# Altium PCB StylophonePCB.PcbDoc
Units mm, origin at the board's own origin, x right, y up, seen from the top; angles counter-clockwise.
Board outline 85.6 x 53.97 mm, 2 copper layers (Top Layer, Bottom Layer), stack 1.57 mm thick; 82 components, 62 nets, 235 pads, 49 vias.
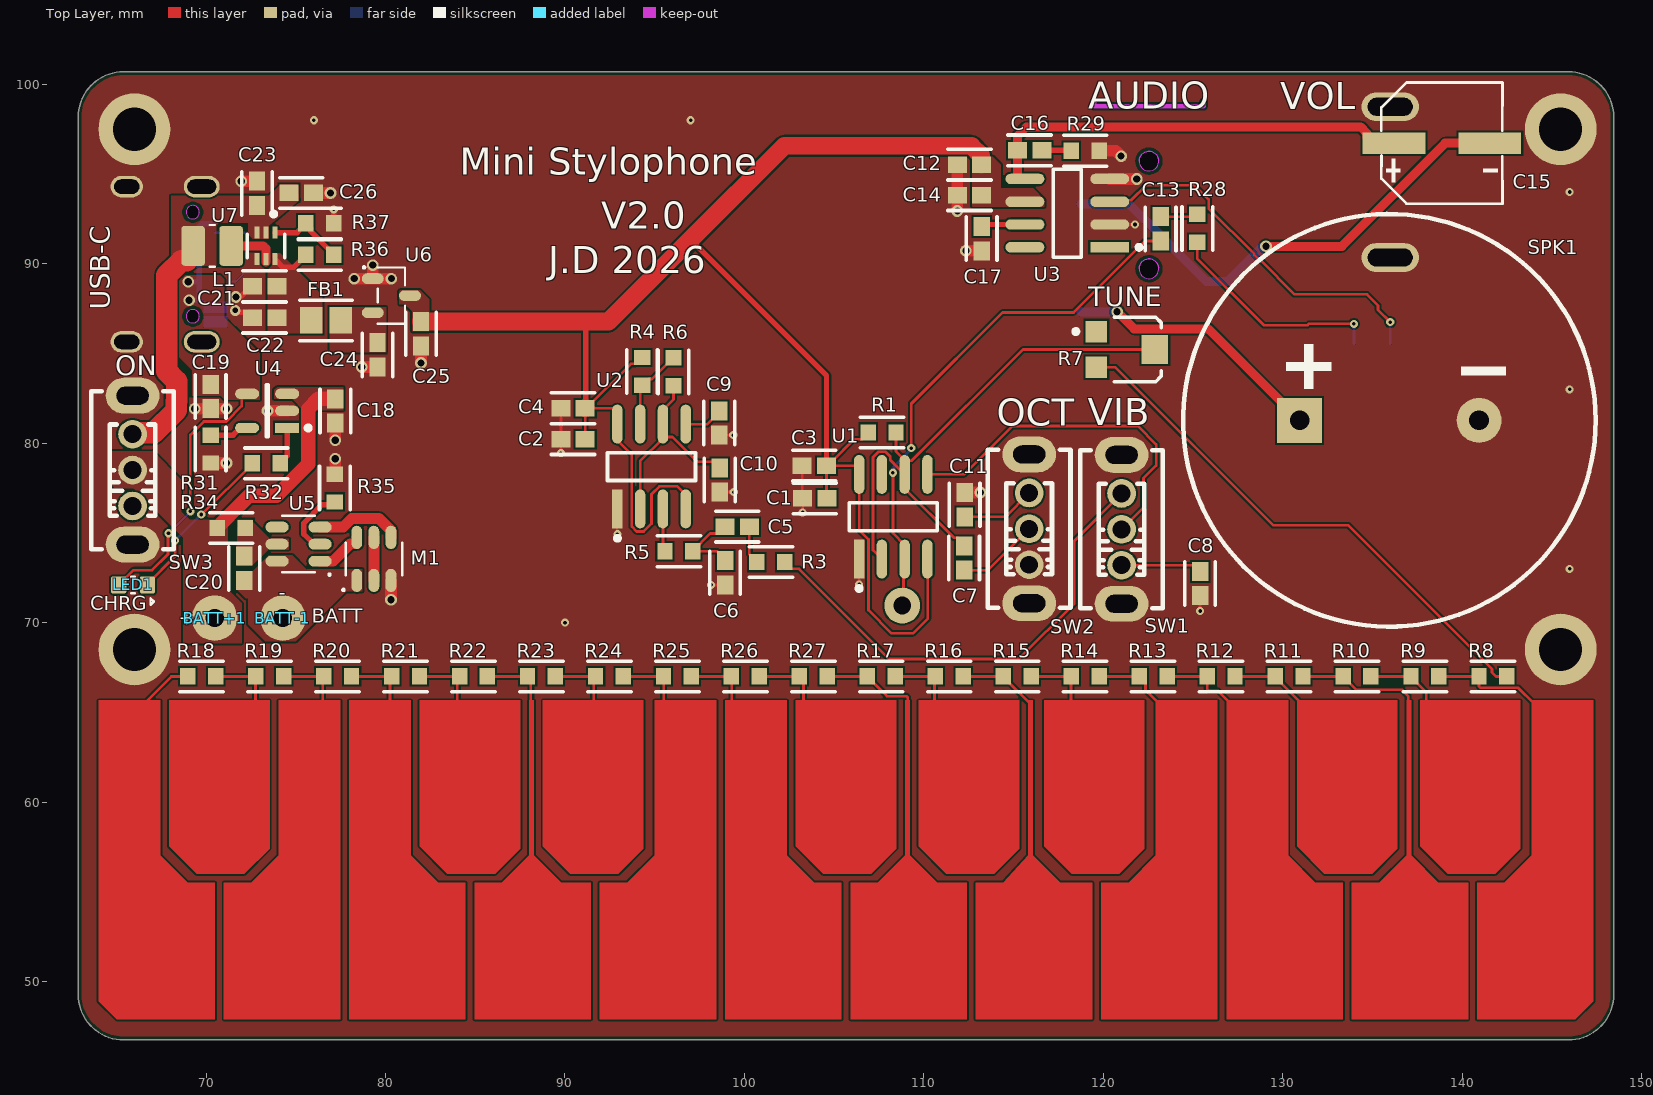
[diagram p0: Top Layer view]
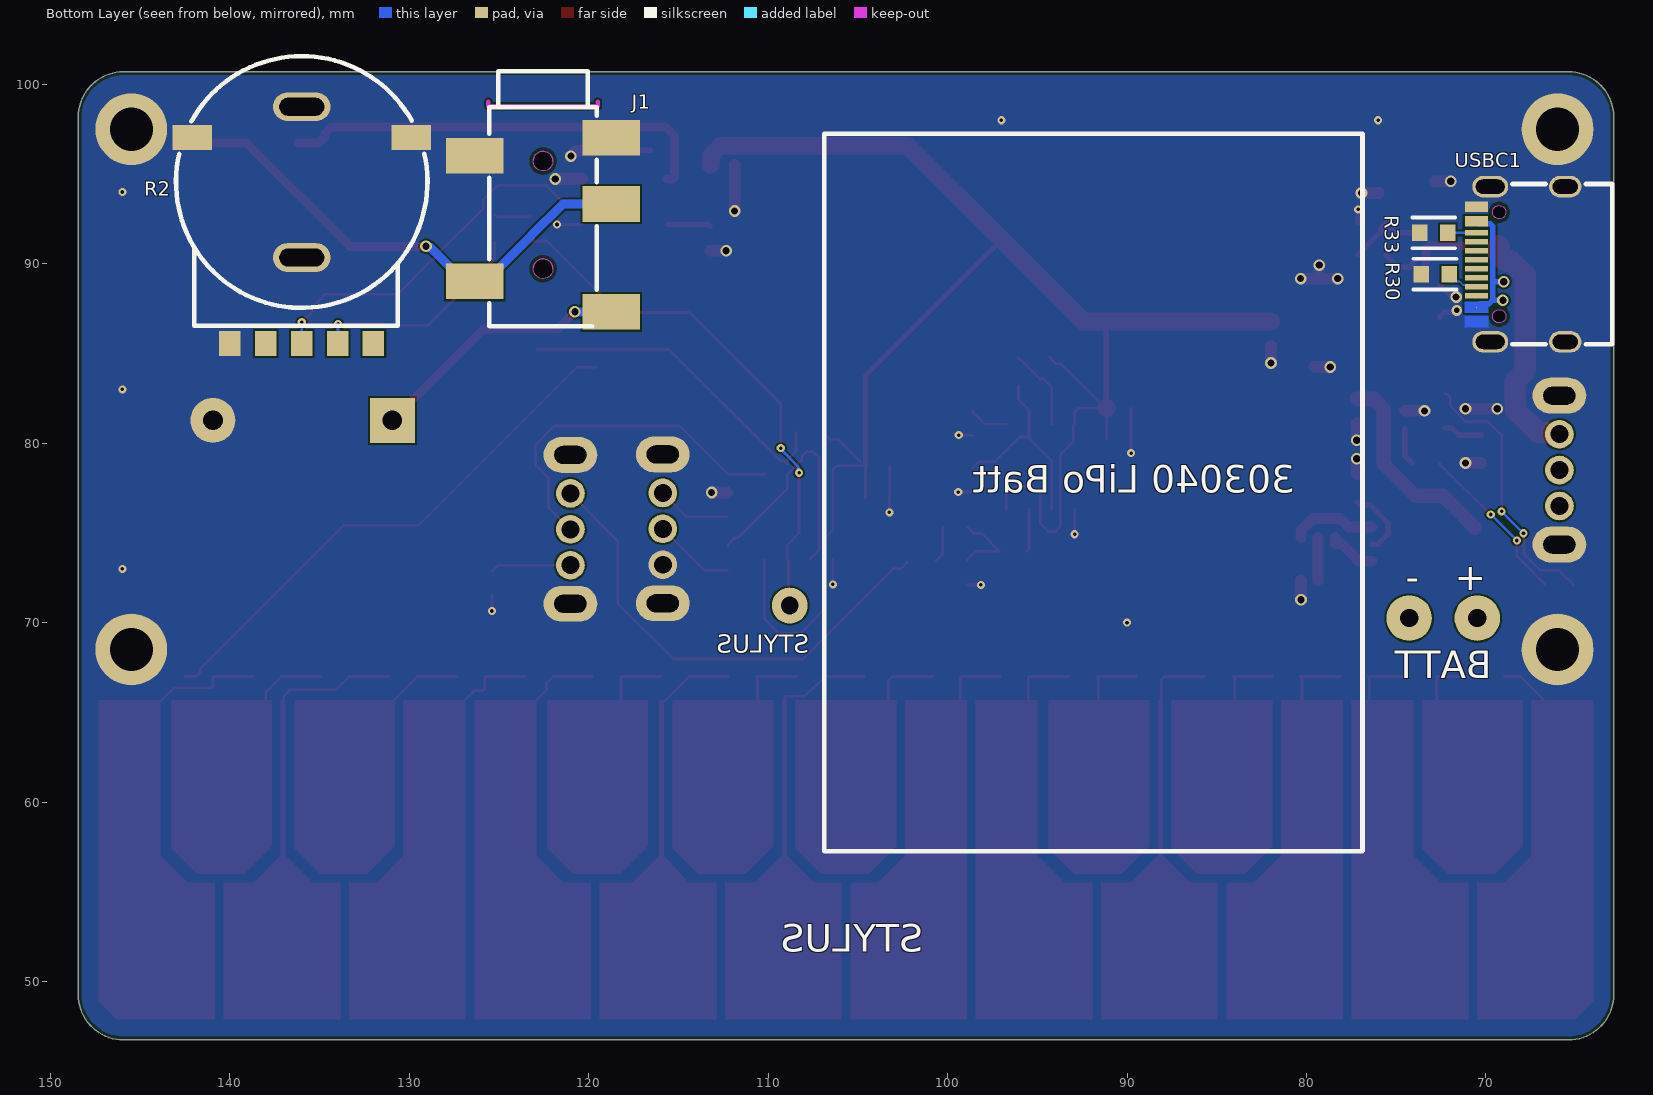
[diagram p1: Bottom Layer view, seen from below]
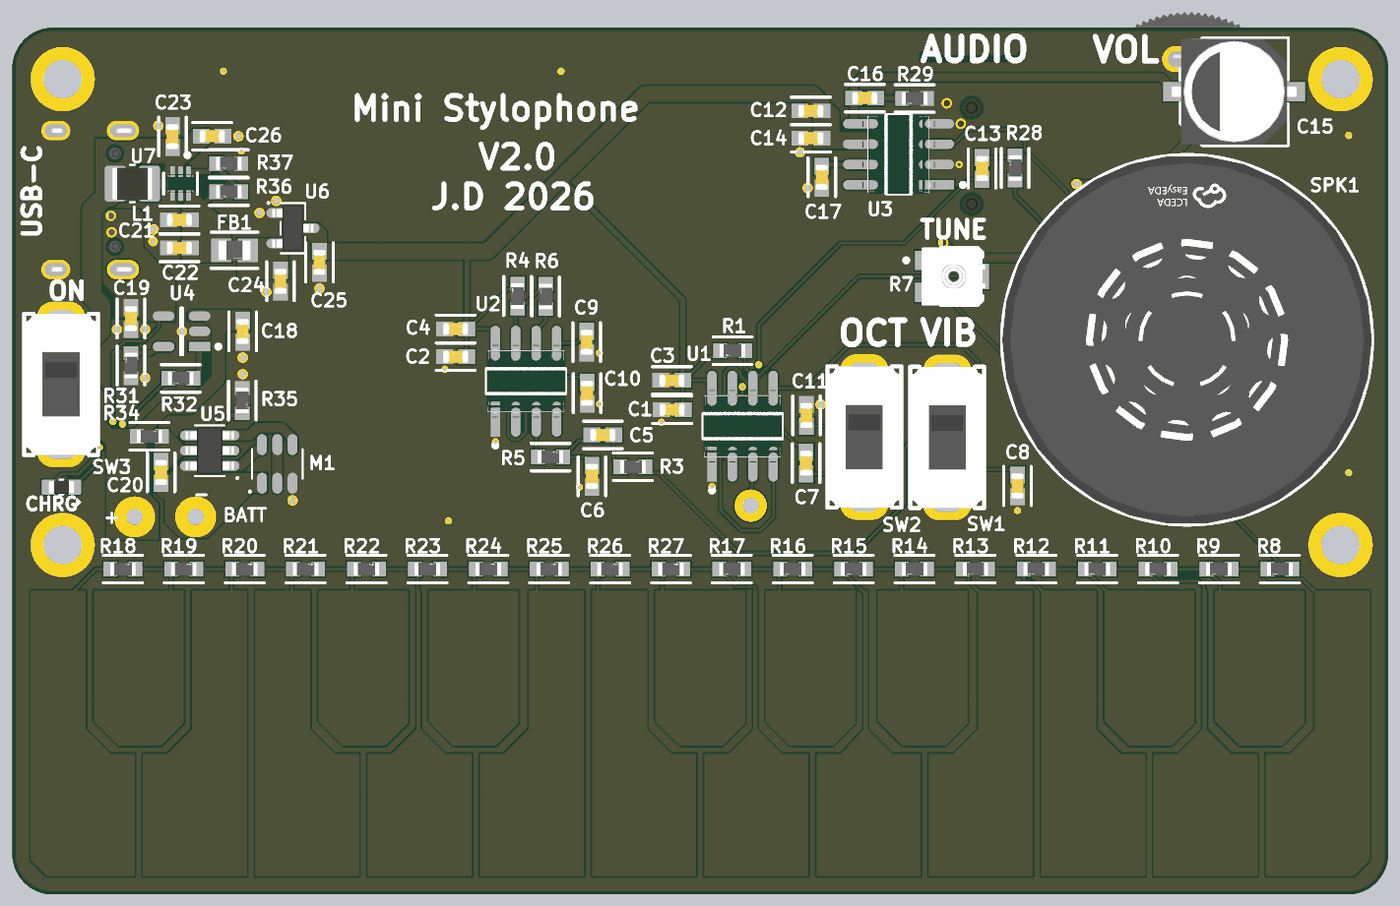
[diagram p2: 3D render of the assembled board from above, using the file's embedded part models]
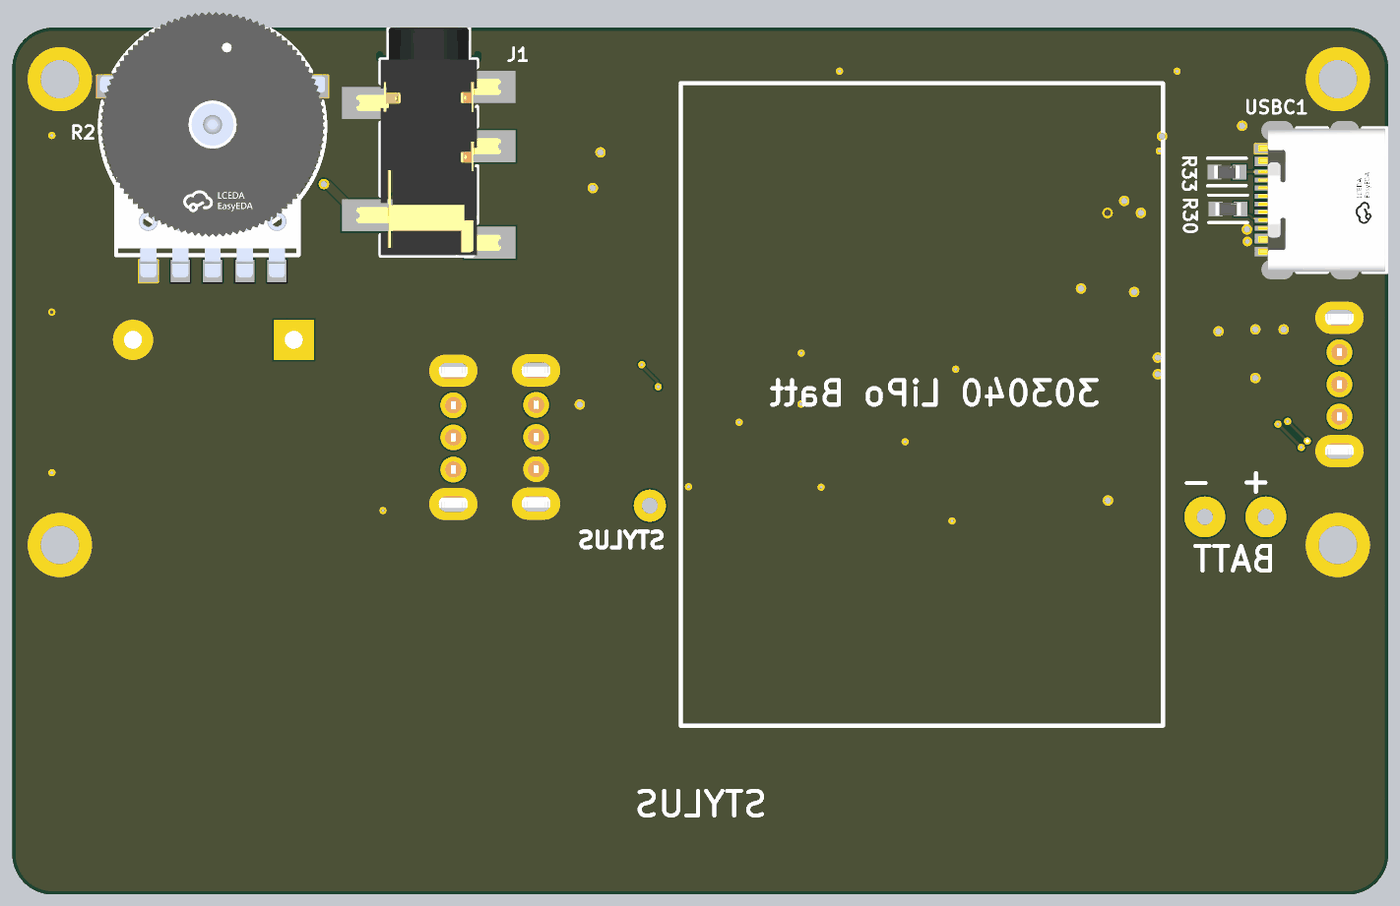
[diagram p3: 3D render of the assembled board from below, using the file's embedded part models]

## Layer stack, top to bottom
Top Solder: solder mask 0.015, Solder Resist, Dk 3.8
Top Layer: signal copper 0.035
Dielectric 1: dielectric 1.5, FR-4, Dk 4.5
Bottom Layer: signal copper 0.035
Bottom Solder: solder mask 0.015, Solder Resist, Dk 3.8

## Board outline
62.865,49.276 ccw(c65.405,49.276) 65.405,46.736 145.923,46.736 ccw(c145.923,49.276) 148.463,49.276 148.463,98.171 ccw(c145.923,98.171) 145.923,100.711 65.405,100.711 ccw(c65.405,98.171) 62.865,98.171

## Design rules (kind name [scope] priority, off if disabled: settings)
BoardOutlineClearance [All] p1: gap=0.2 ignorepadtopadclearanceinfootprint=FALSE
Clearance [All] p1: gap=0.1 ignorepadtopadclearanceinfootprint=TRUE except(0.35: Arc-THPad Track-THPad)
Clearance Clearance_1 [All] p2: gap=0.1 ignorepadtopadclearanceinfootprint=TRUE
DiffPairsRouting [All] p1: maxlimit=0.203 minlimit=0.203 mostfreqgap=0.203 toplayer_minwidth=0.24 toplayer_maxwidth=0.28 toplayer_prefwidth=0.261 bottomlayer_minwidth=0.24 bottomlayer_maxwidth=0.28 bottomlayer_prefwidth=0.261 maxuncoupledlength=3
HoleSize [All] p1: absolutevalues=TRUE maxlimit=6.3 minlimit=0.2 maxpercent=80.000 minpercent=20.000
HoleToHoleClearance [All] p1: gap=0.2 allowstackedmicrovias=TRUE
MinimumAnnularRing [Not IsVia] p1: minimumring=0.199
MinimumSolderMaskSliver MinimumSolderMaskSliver_Footprint [InAnyComponent vs InAnyComponent] p1: minsoldermaskwidth=0.09
MinimumSolderMaskSliver [All] p2: minsoldermaskwidth=0.1
PolygonConnect [All] p1: connectstyle=Direct reliefconductorwidth=0.5 reliefentries=4 polygonreliefangle="90 Angle" conductorbypadedge=TRUE mindistance=0.381 enablemindistance=FALSE airgapwidth=0.254
RoutingVias [All] p1: holewidth=0.2 width=0.45 viastyle="Through Hole" minholewidth=0.2 minwidth=0.45 maxholewidth=0.4 maxwidth=0.65
SilkToSilkClearance [All] p1: silktosilkclearance=0.15
SilkToSolderMaskClearance [IsPad] p1: minsilkscreentomaskgap=0.15 clearancetoexposedcopper=TRUE
SolderMaskExpansion [All] p1: expansion=0 istentingtop=FALSE
SupplyNets "Schematic Supply Nets_6" [InNet('5V_USB')] p1: voltage=0.000
SupplyNets "Schematic Supply Nets_5" [InNet('5V')] p2: voltage=0.000
SupplyNets "Schematic Supply Nets_4" [InNet('BATT+')] p3: voltage=0.000
SupplyNets "Schematic Supply Nets_3" [InNet('+3V3')] p4: voltage=0.000
SupplyNets "Schematic Supply Nets_2" [InNet('+1V1')] p5: voltage=0.000
SupplyNets "Schematic Supply Nets_1" [InNet('+5V')] p6: voltage=0.000
SupplyNets "Schematic Supply Nets" [InNet('GND')] p7: voltage=0.000
Width [All] p1: maxlimit=3 minlimit=0.1 preferedwidth=0.15 minimp=50.000000 maximp=50.000000 favimp=50.000000
24 further rules are at their usual default settings.

## Classes and differential pairs
component class ToneGenerator: C1 C2 C3 C4 C5 C6 C7 C8 C9 C10 C11 R1 R3 R4 R5 R6 R7 R8 R9 R10 R11 R12 R13 R14 R15 R16 R17 R18 R19 R20 R21 R22 R23 R24 R25 R26 R27 SW1 SW2 U1 U2
component class Power: BATT+1 BATT-1 C18 C19 C20 C21 C22 C23 C24 C25 C26 FB1 L1 LED1 M1 R30 R31 R32 R33 R34 R35 R36 R37 SW3 U4 U5 U6 U7 USBC1
component class Amplifier: C12 C13 C14 C15 C16 C17 J1 R2 R28 R29 SPK1 U3

## Components (designator, comment, footprint, x,y, rotation, side; value= is the part's Value field where it differs from the comment)
BATT+1 "THT 100mil pad" "THT 100mil pad-Footprint-1"#1 70.475,70.2 r90 top
BATT-1 "THT 100mil pad" "THT 100mil pad-Footprint-1"#2 74.275,70.25 r90 top
C1 "Cap 22uF 0603" FP-CC0603-DA-IPC_B 104.6,76.925 r180 top value=22uF
C2 "Cap 22uF 0603" FP-CC0603-DA-IPC_B 91.129,80.225 r180 top value=22uF
C3 "Cap 100nF 0603" FP-CC0603-DA-IPC_B 104.575,78.75 r180 top value=100nF
C4 "Cap 100nF 0603" FP-CC0603-DA-IPC_B 91.129,81.95 r180 top value=100nF
C5 "Cap 10uF 0603" FP-CC0603-DA-IPC_B 98.925,75.35 r0 top value=10uF
C6 "Cap 1uF 0603" FP-CC0603-DA-IPC_B 98.925,72.1 r90 top value=1uF
C7 "Cap 100nF 0603" FP-CC0603-DA-IPC_B 112.25,74.275 r270 top value=100nF
C8 "Cap 10nF 0603" FP-CC0603-DA-IPC_B 125.4,71.5 r90 top value=10nF
C9 "Cap 10nF 0603" FP-CC0603-DA-IPC_B 98.6,80.45 r90 top value=10nF
C10 "Cap 10uF 0603" FP-CC0603-DA-IPC_B 98.625,77.275 r90 top value=10uF
C11 "Cap 100nF 0603" FP-CC0603-DA-IPC_B 112.275,75.896 r90 top value=100nF
C12 "Cap 22uF 0603" FP-CC0603-DA-IPC_B 113.225,95.525 r180 top value=22uF
C13 "Cap 1uF 0603" FP-CC0603-DA-IPC_B 123.2,91.271 r90 top value=1uF
C14 "Cap 100nF 0603" FP-CC0603-DA-IPC_B 113.225,93.825 r180 top value=100nF
C15 "VT1C221M0607" VT1C221M0607-Footprint-1 134.46,93.349 r0 top value=220uF
C16 "Cap 100nF 0603" FP-CC0603-DA-IPC_B 115.225,96.325 r0 top value=100nF
C17 "Cap 10uF 0603" FP-CC0603-DA-IPC_B 113.225,90.725 r90 top value=10uF
C18 "Cap 4.7uF 0603" FP-CC0603-DA-IPC_B 77.2,81.121 r90 top value=4.7uF
C19 "Cap 4.7uF 0603" FP-CC0603-DA-IPC_B 70.25,81.921 r90 top value=4.7uF
C20 "Cap 100nF 0603" FP-CC0603-DA-IPC_B 72.125,72.346 r90 top value=100nF
C21 "Cap 22uF 0603" FP-CC0603-DA-IPC_B 72.585,88.75 r0 top value=22uF
C22 "Cap 22uF 0603" FP-CC0603-DA-IPC_B 72.585,87 r0 top value=22uF
C23 "Cap 10uF 0603" FP-CC0603-DA-IPC_B 72.835,94.604 r270 top value=10uF
C24 "Cap 1uF 0603" FP-CC0603-DA-IPC_B 79.55,84.246 r90 top value=1uF
C25 "Cap 1uF 0603" FP-CC0603-DA-IPC_B 81.975,85.425 r90 top value=1uF
C26 "Cap 100nF 0603" FP-CC0603-DA-IPC_B 75.979,93.95 r180 top value=100nF
FB1 "BLM21AG601SN1D" FP-BLM21-0_2-t0_85-e0_5-IPC_B 76.685,86.85 r0 top
J1 "PJ-327A 5JJ" "PJ-327A 5JJ-Footprint-1" 122.55,92.176 r180 bottom
L1 "FWP252012P-1R0ML" INDC2520X120N 70.335,91 r0 top
LED1 "XL-1608SURC-06" DIOC1608X60N 65.925,72.1 r180 top
M1 "FS8205A" SOT95P280X125-6N 79.35,73.55 r90 top
R1 "Res 1M 0603" FP-RC0603-0_55-IPC_B 107.675,80.6 r180 top value=1M
R2 "RK10J12R0A0B" RK10J12R0A0B-Footprint-1 136,92.152 r180 bottom
R3 "Res 47k 0603" FP-RC0603-0_55-IPC_B 101.475,73.375 r0 top value=47k
R4 "Res 1k 0603" FP-RC0603-0_55-IPC_B 94.3,84 r90 top value=1k
R5 "Res 100k 0603" FP-RC0603-0_55-IPC_B 96.35,73.975 r0 top value=100k
R6 "Res 10k 0603" FP-RC0603-0_55-IPC_B 96.05,83.975 r90 top value=10k
R7 "TC33X-2-103E" BOUR-TC33X-2_V 121.425,85.225 r0 top value=10k
R8 "Res 5k1 0603" FP-RC0603-0_55-IPC_B 141.723,67 r180 top value=5.9k
R9 "Res 620R 0603" FP-RC0603-0_55-IPC_B 137.935,67 r180 top value=649
R10 "Res 680R 0603" FP-RC0603-0_55-IPC_B 134.147,67 r180 top value=698
R11 "Res 750R 0603" FP-RC0603-0_55-IPC_B 130.359,67 r180 top value=715
R12 "Res 750R 0603" FP-RC0603-0_55-IPC_B 126.571,67 r180 top value=787
R13 "Res 820R 0603" FP-RC0603-0_55-IPC_B 122.783,67 r180 top value=806
R14 "Res 910R 0603" FP-RC0603-0_55-IPC_B 118.995,67 r180 top value=887
R15 "Res 910R 0603" FP-RC0603-0_55-IPC_B 115.207,67 r180 top value=909
R16 "Res 1k 0603" FP-RC0603-0_55-IPC_B 111.419,67 r180 top value=976
R17 "Res 1k 0603" FP-RC0603-0_55-IPC_B 107.631,67 r180 top value=1.02k
R18 "Res 1k8 0603" FP-RC0603-0_55-IPC_B 69.75,67 r0 top value=1.82k
R19 "Res 1k8 0603" FP-RC0603-0_55-IPC_B 73.538,67 r0 top value=1.74k
R20 "Res 1k6 0603" FP-RC0603-0_55-IPC_B 77.326,67 r0 top value=1.65k
R21 "Res 1k5 0603" FP-RC0603-0_55-IPC_B 81.114,67 r0 top value=1.54k
R22 "Res 1k5 0603" FP-RC0603-0_55-IPC_B 84.902,67 r0 top value=1.47k
R23 "Res 1k3 0603" FP-RC0603-0_55-IPC_B 88.69,67 r0 top value=1.37k
R24 "Res 1k3 0603" FP-RC0603-0_55-IPC_B 92.478,67 r0 top value=1.3k
R25 "Res 1k3 0603" FP-RC0603-0_55-IPC_B 96.266,67 r0 top value=1.21k
R26 "Res 1k1 0603" FP-RC0603-0_55-IPC_B 100.055,67 r0 top value=1.18k
R27 "Res 1k1 0603" FP-RC0603-0_55-IPC_B 103.843,67 r0 top value=1.1k
R28 "Res 180k 0603" FP-RC0603-0_55-IPC_B 125.25,91.975 r90 top value=180k
R29 "Res 10R 0603" FP-RC0603-0_55-IPC_B 119,96.3 r180 top value=10
R30 "Res 5k1 0603" FP-RC0603-0_55-IPC_B 72.825,89.425 r180 bottom value=5.1k
R31 "Res 3k 0603" FP-RC0603-0_55-IPC_B 70.25,79.675 r90 top value=3k
R32 "Res 470 0603" FP-RC0603-0_55-IPC_B 73.35,78.875 r180 top value=470
R33 "Res 5k1 0603" FP-RC0603-0_55-IPC_B 72.9,91.725 r180 bottom value=5.1k
R34 "Res 100R 0603" FP-RC0603-0_55-IPC_B 71.4,75.275 r0 top value=100R
R35 "Res 1k 0603" FP-RC0603-0_55-IPC_B 77.175,77.5 r270 top value=1k
R36 "Res 820k 0603" FP-RC0603-0_55-IPC_B 76.335,90.5 r180 top value=820k
R37 "Res 100k 0603" FP-RC0603-0_55-IPC_B 76.335,92.25 r180 top value=100k
SPK1 "GSPK2307P-8R1W" GSPK2307P-8R1W-Footprint-1 124.39,69.588 r0 top
SW1 "SS12D07VG4 087" "SS12D07VG4 087-Footprint-1" 121.025,75.199 r90 top
SW2 "SS12D07VG4 087" "SS12D07VG4 087-Footprint-1" 115.875,75.225 r90 top
SW3 "SS12D07VG4 087" "SS12D07VG4 087-Footprint-1" 65.9,78.5 r90 top
U1 "LMC555" FP-D0008A-IPC_B 108.3,75.9 r90 top
U2 "LMC555" FP-D0008A-IPC_B 94.825,78.7 r90 top
U3 "LM386MX-1/NOPB" FP-D0008A-IPC_B 118,92.825 r180 top
U4 "MCP73831T-2ACI/OT" FP-C04-091-OT-IPC_B 73.4,81.8 r180 top
U5 "DW01A" SOT95P280X120-6N 75.15,74.375 r180 top
U6 "XC6206P502MR-MS" SOT95P240X115-3N 80.325,88.225 r0 top
U7 "TPS61023DRLR" FP-DRL0006A-MFG 73.335,91 r270 top
USBC1 "TYPE-C-31-M-12" TYPE-C-31-M-12-Footprint-1 69.755,94.3 r90 bottom

## Footprints (in the part's own frame and the unit in brackets; to place one, negate y for a bottom-side part, rotate by r counter-clockwise, add the part's x,y. Pads: shape width x height; smd on the part's side, far side on the other; paste and mask are expansions set on the pad)
BOUR-TC33X-2_V [mm] "SMD, 3-Leads, Body 3.8x3.6mm"
  rect 1.2x1.2 smd: 1(-1.8,1) 3(-1.8,-1)
  rect 1.5x1.6 smd: 2(1.45,0)
  silkscreen extent -3.07,-1.8 1.8,1.8, body extent -2,-1.8 1.96,1.8, height 1.15
DIOC1608X60N [mm] "Chip Diode, 2-Leads, Body 1.60x0.80mm, IPC Medium Density"
  rrect25% 0.85x0.95 smd: 1(-0.8,0) 2(0.8,0)
  silkscreen extent -1.16,-0.46 0.11,1.12, body extent -0.8,-0.4 0.8,0.4, height 0.6
FP-BLM21-0_2-t0_85-e0_5-IPC_B [mm]
  rect 1.255x1.456 smd paste+0 mask+0: 1(-0.826,0) 2(0.826,0)
  silkscreen extent -1.45,-1.13 1.45,1.13, body extent -1.7,-0.98 1.7,0.98, height 0.25
FP-C04-091-OT-IPC_B [mm]
  rect 1.338x0.578 smd paste+0 mask+0: 1(-1.116,0.95)
  rrect100% 1.338x0.578 smd paste+0 mask+0: 2(-1.116,0) 3(-1.116,-0.95) 4(1.116,-0.95) 5(1.116,0.95)
  silkscreen extent -2.41,-1.45 0.05,1.45
FP-CC0603-DA-IPC_B [mm]
  rect 1.058x0.912 smd paste+0 mask+0: 1(0,0) 2(1.354,0)
  silkscreen extent -0.53,-0.86 1.88,0.86, body extent -0.78,-0.71 2.13,0.71, height 0.25
FP-D0008A-IPC_B [mm]
  rect 2.169x0.582 smd paste+0 mask+0: 1(-2.364,1.905)
  rrect100% 2.169x0.582 smd paste+0 mask+0: 2(-2.364,0.635) 3(-2.364,-0.635) 4(-2.364,-1.905) 5(2.364,-1.905) 6(2.364,-0.635) 7(2.364,0.635) 8(2.364,1.905)
  silkscreen extent -4.12,-2.45 0.78,2.45, body extent -3.7,-2.7 3.7,2.7, height 0.25
FP-DRL0006A-MFG [mm]
  rrect33% 0.67x0.3 smd paste+0 mask+0: 1(-0.74,0.5) 2(-0.74,0) 3(-0.74,-0.5) 4(0.74,-0.5) 5(0.74,0) 6(0.74,0.5)
  silkscreen extent -1.9,-1.05 0.65,1.05, body extent -1.17,-1.1 1.17,1.1, height 0.25
FP-RC0603-0_55-IPC_B [mm]
  rect 0.859x0.912 smd paste+0 mask+0: 1(-0.777,0) 2(0.777,0)
  silkscreen extent -1.21,-0.86 1.21,0.86, body extent -1.46,-0.71 1.46,0.71, height 0.25
GSPK2307P-8R1W-Footprint-1 [mm]
  rect 2.5x2.5 hole 1.1: +(6.56,11.687)
  round 2.5 hole 1.1: -(16.56,11.687)
  silkscreen extent 0.06,0.19 23.06,23.19, body extent 0.06,0.18 23.06,23.18, height 8.01
INDC2520X120N [mm] "Chip Inductor, 2-Leads, Body 2.50x2.00mm, IPC Medium Density"
  rrect25% 1.3x2.22 smd: 1(-1.06,0) 2(1.06,0)
  silkscreen extent -0.15,-1.16 0.15,1.16, body extent -1.25,-1 1.25,1, height 1.2
"PJ-327A 5JJ-Footprint-1" [mil]
  rect 126x78.7 smd: 1(149.6,190.95) 2(-149.6,151.55) 3(149.6,45.25) 4(-149.6,-124.05) 5(149.6,-190.95)
  Keep-Out Layer board cut-out: 21.6,-96.45 21.3,-100.55 20.1,-104.55 18.2,-108.15 15.7,-111.45 12.6,-114.15 9,-116.15 5.1,-117.55 1,-118.15 -3.1,-117.95 -7.1,-116.95 -10.8,-115.25 -14.2,-112.85 -17,-109.85 -19.3,-106.45 -20.8,-102.55 -21.6,-98.55 -21.6,-94.45 -20.8,-90.35 -19.3,-86.55 -17,-83.15 -14.2,-80.15 -10.8,-77.75 -7.1,-76.05 -3.1,-75.05 1,-74.85 5.1,-75.45 9,-76.75 12.6,-78.85 15.7,-81.55 18.2,-84.75 20.1,-88.45 21.3,-92.35 21.6,-96.45
  Keep-Out Layer board cut-out: 21.6,139.75 21.3,135.65 20.1,131.65 18.2,128.05 15.7,124.75 12.6,122.05 9,120.05 5.1,118.65 1,118.15 -3.1,118.25 -7.1,119.25 -10.8,120.95 -14.2,123.35 -17,126.35 -19.3,129.85 -20.8,133.65 -21.6,137.65 -21.6,141.75 -20.8,145.85 -19.3,149.65 -17,153.15 -14.2,156.05 -10.8,158.45 -7.1,160.15 -3.1,161.15 1,161.35 5.1,160.75 9,159.45 12.6,157.35 15.7,154.65 18.2,151.45 20.1,147.75 21.3,143.85 21.6,139.75
  Keep-Out Layer region: 21.6,-96.45 21.3,-100.55 20.1,-104.55 18.2,-108.15 15.7,-111.45 12.6,-114.15 9,-116.15 5.1,-117.55 1,-118.15 -3.1,-117.95 -7.1,-116.95 -10.8,-115.25 -14.2,-112.85 -17,-109.85 -19.3,-106.45 -20.8,-102.55 -21.6,-98.55 -21.6,-94.45 -20.8,-90.35 -19.3,-86.55 -17,-83.15 -14.2,-80.15 -10.8,-77.75 -7.1,-76.05 -3.1,-75.05 1,-74.85 5.1,-75.45 9,-76.75 12.6,-78.85 15.7,-81.55 18.2,-84.75 20.1,-88.45 21.3,-92.35 21.6,-96.45
  Keep-Out Layer region: 21.6,-96.45 21.3,-100.55 20.1,-104.55 18.2,-108.15 15.7,-111.45 12.6,-114.15 9,-116.15 5.1,-117.55 1,-118.15 -3.1,-117.95 -7.1,-116.95 -10.8,-115.25 -14.2,-112.85 -17,-109.85 -19.3,-106.45 -20.8,-102.55 -21.6,-98.55 -21.6,-94.45 -20.8,-90.35 -19.3,-86.55 -17,-83.15 -14.2,-80.15 -10.8,-77.75 -7.1,-76.05 -3.1,-75.05 1,-74.85 5.1,-75.45 9,-76.75 12.6,-78.85 15.7,-81.55 18.2,-84.75 20.1,-88.45 21.3,-92.35 21.6,-96.45
  Keep-Out Layer region: 21.6,139.75 21.3,135.65 20.1,131.65 18.2,128.05 15.7,124.75 12.6,122.05 9,120.05 5.1,118.65 1,118.15 -3.1,118.25 -7.1,119.25 -10.8,120.95 -14.2,123.35 -17,126.35 -19.3,129.85 -20.8,133.65 -21.6,137.65 -21.6,141.75 -20.8,145.85 -19.3,149.65 -17,153.15 -14.2,156.05 -10.8,158.45 -7.1,160.15 -3.1,161.15 1,161.35 5.1,160.75 9,159.45 12.6,157.35 15.7,154.65 18.2,151.45 20.1,147.75 21.3,143.85 21.6,139.75
  Keep-Out Layer region: 21.6,139.75 21.3,135.65 20.1,131.65 18.2,128.05 15.7,124.75 12.6,122.05 9,120.05 5.1,118.65 1,118.15 -3.1,118.25 -7.1,119.25 -10.8,120.95 -14.2,123.35 -17,126.35 -19.3,129.85 -20.8,133.65 -21.6,137.65 -21.6,141.75 -20.8,145.85 -19.3,149.65 -17,153.15 -14.2,156.05 -10.8,158.45 -7.1,160.15 -3.1,161.15 1,161.35 5.1,160.75 9,159.45 12.6,157.35 15.7,154.65 18.2,151.45 20.1,147.75 21.3,143.85 21.6,139.75
  Keep-Out Layer lines w0.1: 21.6,-96.45 21.3,-92.35 20.1,-88.45 18.2,-84.75 15.7,-81.55 12.6,-78.85 9,-76.75 5.1,-75.45 1,-74.85 -3.1,-75.05 -7.1,-76.05 -10.8,-77.75 -14.2,-80.15 -17,-83.15 -19.3,-86.55 -20.8,-90.35 -21.6,-94.45 -21.6,-98.55 -20.8,-102.55 -19.3,-106.45 -17,-109.85 -14.2,-112.85 -10.8,-115.25 -7.1,-116.95 -3.1,-117.95 1,-118.15 5.1,-117.55 9,-116.15 12.6,-114.15 15.7,-111.45 18.2,-108.15 20.1,-104.55 21.3,-100.55 21.6,-96.45 ; 21.6,139.75 21.3,143.85 20.1,147.75 18.2,151.45 15.7,154.65 12.6,157.35 9,159.45 5.1,160.75 1,161.35 -3.1,161.15 -7.1,160.15 -10.8,158.45 -14.2,156.05 -17,153.15 -19.3,149.65 -20.8,145.85 -21.6,141.75 -21.6,137.65 -20.8,133.65 -19.3,129.85 -17,126.35 -14.2,123.35 -10.8,120.95 -7.1,119.25 -3.1,118.25 1,118.15 5.1,118.65 9,120.05 12.6,122.05 15.7,124.75 18.2,128.05 20.1,131.65 21.3,135.65 21.6,139.75
  Keep-Out Layer lines w10: 120,269.95 120,259.95 -120,259.95 -120,269.95
  silkscreen extent -118,-222 118,337, body extent -177,-222 177,337, height 187
RK10J12R0A0B-Footprint-1 [mil]
  rect 47.2x55.1 smd paste-3937 mask+2: 1(-157.45,-259.85) 2(-78.75,-259.85) 3(157.45,-259.85) 4(0.05,-259.85) 5(78.75,-259.85)
  rect 86.6x55.1 smd paste-3937 mask+2: 6(-240.15,192.85) 6(240.15,192.85)
  oval 126x63 hole 39.4 slot 98.4 at 0 deg: 7(0.05,-70.95) 7(0.05,259.85)
  silkscreen extent -276,-221 276,371, body extent -276,-275 276,375, height 98
SOT95P240X115-3N [mm] "SOT23, 3-Leads, Body 2.90x2.40mm, Pitch 0.95mm, IPC Medium Density"
  oval 1.225x0.6 smd: 1(-1.038,0.95) 2(-1.038,-0.95) 3(1.037,0)
  silkscreen extent -1.59,-1.56 0.76,1.64, body extent -1.28,-1.45 1.28,1.45, height 1.15
SOT95P280X120-6N [mm] "SOT23, 6-Leads, Body 2.91x2.80mm, Pitch 0.95mm, IPC Medium Density"
  oval 1.3x0.6 smd: 1(-1.2,0.95) 2(-1.2,0) 3(-1.2,-0.95) 4(1.2,-0.95) 5(1.2,0) 6(1.2,0.95)
  silkscreen extent -1.79,-1.57 0.91,1.76, body extent -1.5,-1.46 1.5,1.46, height 1.2
SOT95P280X125-6N [mm] "SOT23, 6-Leads, Body 2.92x2.80mm, Pitch 0.95mm, IPC Medium Density"
  oval 1.3x0.6 smd: 1(-1.2,0.95) 2(-1.2,0) 3(-1.2,-0.95) 4(1.2,-0.95) 5(1.2,0) 6(1.2,0.95)
  silkscreen extent -1.79,-1.57 0.91,1.76, body extent -0.8,-1.46 0.8,1.46, height 1.25
"SS12D07VG4 087-Footprint-1" [mil]
  round 63 hole 39.4: 1(-78.75,0) 2(0.05,0) 3(78.75,0)
  oval 78.7x118.1 hole 39.4 slot 70.9 at 90 deg: 4(163.35,0) 5(-163.35,0)
  silkscreen extent -173,-91 173,91, body extent -173,-91 173,91, height 343
"THT 100mil pad-Footprint-1"#1 [mm]
  round 2.54 hole 1.016: 1(0.05,0)
"THT 100mil pad-Footprint-1"#2 [mm]
  round 2.54 hole 1.016: 1(0,0)
TYPE-C-31-M-12-Footprint-1 [mm]
  oval 1.2x2 hole 0.8 slot 1.6 at 90 deg: 1(0,0) 4(-8.65,0)
  oval 1.2x1.8 hole 0.8 slot 1.4 at 90 deg copper offset 0,0: 2(0,-4.18) 3(-8.65,-4.18)
  round 0.025 smd paste-100 mask+0.051: A1B12(-7.525,0.768) A4B9(-6.731,0.762)
  rect 0.3x1.3 smd paste-100 mask+0.051: A5(-5.575,0.768) A6(-4.575,0.768) A7(-4.075,0.768) A8(-3.075,0.768) B5(-2.575,0.768) B6(-3.575,0.768) B7(-5.075,0.768) B8(-6.075,0.768)
  rect 0.6x1.3 smd paste-100 mask+0.051: B1A12(-1.125,0.768) B4A9(-1.925,0.768)
  Keep-Out Layer board cut-out: -1.05,-0.5 -1.087,-0.663 -1.191,-0.793 -1.342,-0.866 -1.508,-0.866 -1.659,-0.793 -1.763,-0.663 -1.8,-0.5 -1.8,-0.5 -1.763,-0.337 -1.659,-0.207 -1.508,-0.134 -1.342,-0.134 -1.191,-0.207 -1.087,-0.337 -1.05,-0.5
  Keep-Out Layer board cut-out: -6.85,-0.5 -6.887,-0.663 -6.991,-0.793 -7.141,-0.866 -7.308,-0.866 -7.459,-0.793 -7.563,-0.663 -7.6,-0.5 -7.6,-0.5 -7.563,-0.337 -7.459,-0.207 -7.308,-0.134 -7.141,-0.134 -6.991,-0.207 -6.887,-0.337 -6.85,-0.5
  Keep-Out Layer circle w0.025: c-1.425,-0.5 r0.375
  Keep-Out Layer circle w0.025: c-7.225,-0.5 r0.375
  Keep-Out Layer region: -1.05,-0.5 -1.087,-0.663 -1.191,-0.793 -1.342,-0.866 -1.508,-0.866 -1.659,-0.793 -1.763,-0.663 -1.8,-0.5 -1.8,-0.5 -1.763,-0.337 -1.659,-0.207 -1.508,-0.134 -1.342,-0.134 -1.191,-0.207 -1.087,-0.337 -1.05,-0.5
  Keep-Out Layer region: -6.85,-0.5 -6.887,-0.663 -6.991,-0.793 -7.141,-0.866 -7.308,-0.866 -7.459,-0.793 -7.563,-0.663 -7.6,-0.5 -7.6,-0.5 -7.563,-0.337 -7.459,-0.207 -7.308,-0.134 -7.141,-0.134 -6.991,-0.207 -6.887,-0.337 -6.85,-0.5
  silkscreen extent -8.79,-6.8 0.15,-1.22, body extent -8.79,-6.7 0.15,1.2, height 3.25
VT1C221M0607-Footprint-1 [mm]
  rect 3.5x1.2 smd: +(1.75,3.376) -(7.09,3.376)
  silkscreen extent 1.04,0 7.8,6.75, body extent 0.52,0.08 8.32,6.68, height 7.7

## Part data
BATT+1 BATT-1: library part CMP-00020-1, "40mil hole, 100mil pad THT", Hole Diameter=40mil, Pad Diameter=100mil
C1 C2 C12 C21 C22: library part CMP-001-00003-1, "22uF 6.3V 20% X5R 0603 SMD Capacitor", Case/Package=0603, Temperature Coefficient=X5R, Tolerance=20%, Voltage Rating=6.3V, Mounting Technology=SMT
C3 C4 C7 C11 C14 C16 C20 C26: library part CMP-00006-5, "100nF 50V 10% X7R 0603 SMD Capacitor Decoupling", Case/Package=0603, Temperature Coefficient=X7R, Tolerance=10%, Voltage Rating=50V, Mounting Technology=SMT
C5 C10 C17 C23: library part CMP-001-00002-1, "10uF 6.3V 10% X5R 0603 SMD Capacitor", Case/Package=0603, Temperature Coefficient=X5R, Tolerance=10%, Voltage Rating=6.3V, Mounting Technology=SMT
C6 C13 C24 C25: library part CMP-001-00001-2, "1uF 25V 10% X5R 0603 SMD Capacitor", Case/Package=0603, Temperature Coefficient=X5R, Tolerance=10%, Voltage Rating=25V, Mounting Technology=SMT
C8 C9: library part CMP-001-00000-5, "10nF 50V 10% X7R 0603 SMD Capacitor", Case/Package=0603, Temperature Coefficient=X7R, Tolerance=10%, Voltage Rating=50V, Mounting Technology=SMT
C15: library part CMP-00005-2, "SMD Aluminum Electrolytic Capacitor SMD, D6.3xL7.7mm 220µF ±20% 16V 2000Hrs@105℃ 110mA@120Hz", Tolerance=20%, Voltage Rating=16V, Diameter=6.3mm, Height=7.7mm, Mounting Technology=SMT
C18 C19: library part CMP-001-00004-1, "4.7uF 16V 10% X5R 0603 SMD Capacitor", Case/Package=0603, Temperature Coefficient=X5R, Tolerance=10%, Voltage Rating=16V, Mounting Technology=SMT
FB1: library part CMP-00030-2, "Ferrite Beads Multi-Layer 600Ohm 25% 100MHz 600mA 210mOhm DCR 0805 T/R", Case Code (Imperial)=0805, Case/Package=0805, Impedance=600Ω
J1: library part CMP-00021-1, "-30℃~+70℃ 3.5mm Headphone Jack 30V 500mA SMD Audio Connectors (Headphones) ROHS"
L1: library part CMP-00031-3, "1MHz ¡À20% 41m¦¸ 3.5A 1¦ÌH 1008 2.5mm(Length)*1.2mm(height)"
LED1: library part CMP-00029-2, "120¡ã 330mcd 1.6*0.8*0.6 mm colourless£¬red£¬transparent 0603"
M1: library part CMP-00026-3, "1.5W 10V 1.2V 5.7NC@ 10V 1INDIVIDUALNCHANNEL 20V 19.5M¦¸@ 4.5V, 3A 6A 466PF@10V SOT-23-6"
R1: library part CMP-009-00021-1, "1M 1% 100mW 0603 SMD Resistor", Case/Package=0603, Power Rating=100mW, Tolerance=1%, Mounting Technology=SMT
R2: library part CMP-00023-1, "±30% 10kΩ SMD-5P, 14x2.5mm Potentiometers, Variable Resistors ROHS"
R3: library part CMP-009-00004-1, "47k 1% 100mW 0603 SMD Resistor", Case/Package=0603, Power Rating=100mW, Tolerance=1%, Mounting Technology=SMT
R4 R16 R17: library part CMP-00011-1, "1k 1% 100mW 0603 SMD Resistor", Case/Package=0603, Power Rating=100mW, Tolerance=1%, Mounting Technology=SMT
R5 R37: library part CMP-009-00003-1, "100k 1% 100mW 0603 SMD Resistor", Case/Package=0603, Power Rating=100mW, Tolerance=1%, Mounting Technology=SMT
R6: library part CMP-009-00000-1, "10k 1% 100mW 0603 SMD Resistor", Case/Package=0603, Power Rating=100mW, Tolerance=1%, Mounting Technology=SMT
R7: library part CMP-00022-2, "SMD 3mm Cermet Trimmer - Leadfree 3MM 10KOHMS 25% 0.1WATT OPEN FRM", Mounting Technology=SMT
R8 R30 R33: library part CMP-009-00005-1, "5.1k 1% 100mW 0603 SMD Resistor", Case/Package=0603, Power Rating=100mW, Tolerance=1%, Mounting Technology=SMT
R9: library part CMP-009-00006-1, "620R 1% 100mW 0603 SMD Resistor", Case/Package=0603, Power Rating=100mW, Tolerance=1%, Mounting Technology=SMT
R10: library part CMP-009-00015-1, "680R 1% 100mW 0603 SMD Resistor", Case/Package=0603, Power Rating=100mW, Tolerance=1%, Mounting Technology=SMT
R11 R12: library part CMP-009-00007-2, "750R 1% 100mW 0603 SMD Resistor", Case/Package=0603, Power Rating=100mW, Tolerance=1%, Mounting Technology=SMT
R13: library part CMP-009-00008-1, "820R 1% 100mW 0603 SMD Resistor", Case/Package=0603, Power Rating=100mW, Tolerance=1%, Mounting Technology=SMT
R14 R15: library part CMP-009-00009-1, "910R 1% 100mW 0603 SMD Resistor", Case/Package=0603, Power Rating=100mW, Tolerance=1%, Mounting Technology=SMT
R18 R19: library part CMP-009-00014-1, "1.8k 1% 100mW 0603 SMD Resistor", Case/Package=0603, Power Rating=100mW, Tolerance=1%, Mounting Technology=SMT
R20: library part CMP-009-00013-1, "1.6k 1% 100mW 0603 SMD Resistor", Case/Package=0603, Power Rating=100mW, Tolerance=1%, Mounting Technology=SMT
R21 R22: library part CMP-009-00012-1, "1.5k 1% 100mW 0603 SMD Resistor", Case/Package=0603, Power Rating=100mW, Tolerance=1%, Mounting Technology=SMT
R23 R24 R25: library part CMP-009-00011-2, "1.3k 1% 100mW 0603 SMD Resistor", Case/Package=0603, Power Rating=100mW, Tolerance=1%, Mounting Technology=SMT
R26 R27: library part CMP-009-00010-1, "1.1k 1% 100mW 0603 SMD Resistor", Case/Package=0603, Power Rating=100mW, Tolerance=1%, Mounting Technology=SMT
R28: library part CMP-009-00001-1, "180k 1% 100mW 0603 SMD Resistor", Case/Package=0603, Power Rating=100mW, Tolerance=1%, Mounting Technology=SMT
R29: library part CMP-009-00002-1, "10R 1% 100mW 0603 SMD Resistor", Case/Package=0603, Power Rating=100mW, Tolerance=1%, Mounting Technology=SMT
R31: library part CMP-009-00025-1, "3k 1% 100mW 0603 SMD Resistor", Case/Package=0603, Power Rating=100mW, Tolerance=1%, Mounting Technology=SMT
R32: library part CMP-00011-2, "470 1% 100mW 0603 SMD Resistor", Case/Package=0603, Power Rating=100mW, Tolerance=1%, Mounting Technology=SMT
R34: library part CMP-009-00020-1, "100R 1% 100mW 0603 SMD Resistor", Case/Package=0603, Power Rating=100mW, Tolerance=1%, Mounting Technology=SMT
R35: library part CMP-009-00023-1, "1k 1% 100mW 0603 SMD Resistor", Case/Package=0603, Power Rating=100mW, Tolerance=1%, Mounting Technology=SMT
R36: library part CMP-009-00024-1, "820k 1% 100mW 0603 SMD Resistor", Case/Package=0603, Power Rating=100mW, Tolerance=1%, Mounting Technology=SMT
SPK1: library part CMP-00000-7, "5% 8R Electromagnetic Speaker 1.7kHz 88dB 500mW 23mm", Power Rating=500mW, Diameter=23mm, Impedance=8R, Mounting Technology=THT
SW1 SW2 SW3: library part CMP-002-000001-2, "Direct Insert 500mA Single Pole Double Throw (SPDT) 50V 5 Thousand Times Plugin Slide Switches ROHS"
U1 U2: library part CMP-001-0000-1, "Single Precision Timer 8-SOIC 0 to 70", Case/Package=SOIC, Max Supply Voltage=15V, Min Supply Voltage=1.5V, Mounting Technology=SMT, Pins=8
U3: library part CMP-00004-1, "700-mW, mono, 5- to 18-V, analog input Class-AB audio amplifier 8-SOIC 0 to 70", Case/Package=SOIC, Max Supply Voltage=12V, Min Supply Voltage=4V, Mounting Technology=SMT, Pins=8
U4: library part CMP-00024-2, "MCP73831 Series Single-Cell Li-Ion/Li-Polymer Battery Charge Controller SOT-23-5", Case/Package=SOT-23
U5: library part CMP-00025-3, "Battery management"
U6: library part CMP-00028-1, "SOT-23, : : : 8V : 5.0V : 250mA (PSRR): 40dB@(1kHz), 2.5%, (IoT)."
U7: library part CMP-00027-1, "Switching Voltage Regulators 3.7-A boost converter with 0.5-V ultra-low input vo"
USBC1: library part CMP-00002-5, "USB Type-C Connector Female SMD 16 pin", Current Rating=5A, Gender=Female, Mounting Technology=SMT

## Free pads (board coordinates)
  round 4 hole 2.4: SCREW_BL(66,68.5) SCREW_BR(145.5,68.5) SCREW_TL(66,97.5) SCREW_TR(145.5,97.5)
  round 2 hole 1: STYLUS(108.8,70.95)

## Via types
v1: diameter 0.65, hole 0.4, Top Layer to Bottom Layer, 24 vias
v2: diameter 0.45, hole 0.2, Top Layer to Bottom Layer, 24 vias
v3: diameter 0.6, hole 0.3, Top Layer to Bottom Layer, 1 vias

## Nets (pads, with @x,y where several pads share a name; then routed paths per layer and width w, separated by ;. In a path a pad name is that pad's centre, name@x,y a point inside that pad or via, vN(x,y) a via of type N, cw(c..) or ccw(c..) an arc to the next point about the centre after c; other vN are vias at no path point)
5V: C1.1 C2.1 C3.1 C4.1 C12.1 C14.1 C25.2 R1.2 R4.2 U1.4 U1.8 U2.4 U2.8 U3.6 U6.3 | length 99.2
  Top Layer w0.15: C2.1 C4.1 ; R4.2 93.946,84.422 93.674,84.422 91.202,81.95 92.71,81.95 92.92,81.74 U2.8 93.003,80.981 93.003,80.064 93.724,79.342 93.724,75.35 93.997,75.077 94.383,75.077 94.825,75.519 94.825,77.154 95.267,77.596 96.264,77.596 96.73,77.13 U2.4 ; C3.1 104.575,76.95 C1.1 ; C3.1@104.648,78.75 106.195,78.75 106.395,78.55 U1.8 106.395,75.16 106.915,74.639 106.915,70.695 108.21,69.4 109.39,69.4 110.225,70.235 110.225,73.516 U1.4 ; C3.1@104.851,78.953 106.117,80.219 106.544,80.219 106.898,80.573 R1.2
  Top Layer w0.3: C4.1@91.15,81.971 91.15,86.779 ; 97.002,91.348 104.575,83.775 C3.1
  Top Layer w1: C25.2 91.15,86.779 92.433,86.779 97.002,91.348 102.235,96.581 112.649,96.581 113.196,96.034 113.196,95.554 C12.1 ; C4.1 C4.1@91.15,81.971
5V_USB: C19.2 LED1.2 U4.4 USBC1.A4B9 USBC1.B4A9 | length 22.5
  Top Layer w0.15: LED1.2 65.125,72.133 65.473,72.481 65.506,72.481 65.951,72.926 66.99,72.926 67.875,73.811 67.875,74.954 v2(67.9,74.979) ; v2(69.121,76.201) 69.121,80.456 69.874,81.209 71.126,81.209 71.979,82.061 71.979,82.552 72.176,82.75 U4.4
  Bottom Layer w0.15: v2(67.9,74.979) v2(69.121,76.201)
  Bottom Layer w0.3: v1(69,89) 69.623,89 ; v1@69.049,87.971 69.623,87.971 ; 69.635,87.959 69.623,87.971 ; USBC1.A4B9 70.316,87.77 69.825,87.77 69.623,87.971 ; USBC1.B4A9 70.373,92.225 69.741,92.225 69.623,92.108 69.623,89 ; 69.623,87.971 69.623,89
  other v1: 69.048,87.972
A3: R18.1 | length 3.9
  Top Layer w0.15: 65.75,65.25 66.309,65.25 68.059,67 R18.1
A4: R15.2 R16.1 | length 4.5
  Top Layer w0.15: R16.1 R15.2 114.43,66.973 116,65.403 116,65.4
A#3: R18.2 R19.1 | length 3.7
  Top Layer w0.15: R18.2 R19.1 72.75,66.989 72.75,65.5
A#4: R14.2 R15.1 | length 3.7
  Top Layer w0.15: R15.1 R14.2 118.2,66.982 118.2,65.5
Audio: C15.- J1.3 J1.4 | length 27.8
  Top Layer w0.5: v1(129.075,90.975) 133.305,90.975 139.055,96.725 C15.-
  Bottom Layer w0.5: J1.3 121.451,93.325 123.226,91.551 123.226,91.548 125.749,89.025 J1.4 126.951,89.025 128.872,90.946 129.046,90.946 v1(129.075,90.975)
B3: R19.2 R20.1 | length 3.8
  Top Layer w0.15: R19.2 R20.1 76.5,66.951 76.5,65.5
B4: R13.2 R14.1 | length 4.2
  Top Layer w0.15: R14.1 R13.2 122.361,66.646 122.361,66.239 123.1,65.5
BATT+: BATT+1.1 C18.2 R34.1 SW3.2 U4.3 | length 11.4
  Top Layer w0.8: R34.1 70.623,75.302 71.247,75.926 71.247,75.938 72.384,77.075 73.919,77.075 75.685,78.841 75.685,81.91 76.25,82.475 C18.2
C4: R20.2 R21.1 | length 3.8
  Top Layer w0.15: R20.2 R21.1 80.25,66.913 80.25,65.5
C5: R12.2 R13.1 | length 4.6
  Top Layer w0.15: R13.1 R12.2 125.794,66.306 125.9,66.2 126.4,66.2 127.1,65.5
C#4: R21.2 R22.1 | length 3.8
  Top Layer w0.15: R21.2 R22.1 84,66.874 84,65.5
C#5: R11.2 R12.1 | length 4.6
  Top Layer w0.15: R12.1 R11.2 129.582,66.973 131.056,65.5 131.3,65.5
D1/D2: M1.2 M1.5 | length 2.4
  Top Layer w0.6: M1.2 M1.5
D4: R22.2 R23.1 | length 3.9
  Top Layer w0.15: R22.2 R23.1 88.1,66.814 88.1,65.4
D5: R10.2 R11.1 | length 6.7
  Top Layer w0.15: R11.1 R10.2 133.37,66.973 134.084,66.259 136.641,66.259 137,65.9 137,65.5
D#4: R23.2 R24.1 | length 4
  Top Layer w0.15: R23.2 R24.1 91.6,66.898 91.6,65.3
D#5: R9.2 R10.1 | length 4.1
  Top Layer w0.15: R10.1 R9.2 137.159,66.973 138,66.132 138,65.5
E4: R24.2 R25.1 | length 3.8
  Top Layer w0.15: R24.2 R25.1 95.5,66.99 95.5,65.4
E5: R8.2 R9.1 | length 6.3
  Top Layer w0.15: R9.1 R8.2 140.947,66.442 141.02,66.369 143.131,66.369 144,65.5 144.1,65.5
F4: R25.2 R26.1 | length 3.7
  Top Layer w0.15: R25.2 R26.1 99.3,66.978 99.3,65.5
F#4: R26.2 R27.1 | length 3.8
  Top Layer w0.15: R26.2 R27.1 103.3,66.766 103.3,65.5
G4: R17.2 R27.2 | length 5.4
  Top Layer w0.15: R27.2 R17.2 106.854,66.973 107.208,66.619 107.235,66.619 107.954,65.9 109.027,65.9 109.1,65.827 109.1,65.4
G#4: R16.2 R17.1 | length 3.8
  Top Layer w0.15: R17.1 R16.2 110.6,66.958 110.6,65.5
GND: C1.2 C2.2 C3.2 C4.2 C6.1 C8.1 C9.1 C10.1 C11.2 C12.2 C14.2 C17.1 C18.1 C19.1 C21.1 C22.1 C23.1 C24.1 C25.1 C26.1 J1.1 J1.2 M1.3 pad.SCREW_BL pad.SCREW_BR pad.SCREW_TL pad.SCREW_TR R2.1 R2.6 R2.7 R29.1 R30.1 R31.1 R33.1 R35.1 R37.1 SPK1.- SW1.4 SW1.5 SW2.1 SW2.4 SW2.5 SW3.4 SW3.5 U1.1 U2.1 U3.2 U3.4 U4.2 U6.1 U7.4 USBC1.1 USBC1.2 USBC1.3 USBC1.4 USBC1.A1B12 USBC1.B1A12 | length 36
  Top Layer w0.15: v2(89.775,79.444) C2.2 C4.2 ; v2(92.92,74.927) U2.1 ; v2(98.144,72.1) C6.1 ; C9.1 v2(99.381,80.45) ; C10.1 v2(99.406,77.275) ; C3.2 103.221,76.95 C1.2 v2(103.246,76.144) ; v2(106.395,72.127) U1.1 ; U3.2 v2(121.773,92.19) ; v2(125.4,70.646) C8.1
  Top Layer w0.3: v3(71.625,87.4) 71.72,87.4 71.814,87.306 72.279,87.306 C22.1 ; v1(71.656,88.15) 71.723,88.217 71.979,88.217 72.512,88.75 C21.1 ; v2(77.11,93.031) 77.112,93.029 R37.1
  Top Layer w0.65: v1(69.369,81.921) C19.1 v1(71.131,81.921) ; R31.1 v1(71.131,78.898) ; v1(71.954,94.6) 72.831,94.6 C23.1 ; v1(73.422,81.8) U4.2 ; C26.1 v1(76.933,93.95) ; R35.1 77.2,78.302 v1(77.2,79.131) ; v1(77.2,80.167) C18.1 ; v1(78.25,89.175) U6.1 ; v1(78.669,84.25) 78.775,84.25 78.779,84.246 C24.1 ; v1(79.287,89.925) U6.1 ; v1(80.3,71.275) M1.3 ; v1(80.325,89.175) U6.1 ; v1(81.975,84.471) C25.1 ; v1(111.871,92.944) C14.2 C12.2 ; C11.2 v1(113.156,77.25) ; v1(112.344,90.725) C17.1 ; R29.1 120.7,96.3 v1(121,96) ; U3.4 v1(121.873,94.73)
  other v2: 90,70 146,73 146,83 146,94 76,98 97,98
NetBATT-1_1: BATT-1.1 C20.1 M1.1 U5.6
NetC5_1: C5.1 C6.2 R5.2 | length 4.4
  Top Layer w0.15: C6.2 98.925,73.527 98.477,73.975 R5.2 97.127,74.002 98.094,74.969 98.544,74.969 C5.1
NetC5_2: C5.2 R3.1 | length 2.1
  Top Layer w0.15: C5.2 100.279,73.821 100.698,73.402 R3.1
NetC7_2: C7.2 SW2.2 | length 4.6
  Top Layer w0.15: C7.2 113.569,72.921 SW2.2
NetC8_2: C8.2 SW1.1 | length 4.5
  Top Layer w0.15: SW1.1 125.056,73.198 C8.2
NetC9_2: C9.2 U2.5 | length 2.2
  Top Layer w0.15: U2.5 97.933,81.064 98.6,81.731 C9.2
NetC10_2: C10.2 R6.1 U2.2 U2.6 | length 12.1
  Top Layer w0.15: U2.2 94.19,79 95.46,80.27 U2.6 ; R6.1 96.05,82.447 95.46,81.857 U2.6 ; C10.2 98.294,78.96 97.381,78.96 95.996,80.345 95.66,80.345 95.46,80.545 U2.6
NetC11_1: C11.1 SW2.3 | length 4.2
  Top Layer w0.15: C11.1 114.546,75.896 SW2.3
NetC13_2: C13.2 R28.2 | length 2.1
  Top Layer w0.15: C13.2 125.123,92.625 R28.2
NetC15_+: C15.+ C16.1 U3.5 | length 24.4
  Top Layer w0.5: U3.5 115.355,94.73 115.225,94.86 115.225,97.125 115.725,97.625 134.346,97.625 134.71,97.261 134.71,97.075 135.06,96.725 C15.+
NetC16_2: C16.2 R29.2 | length 1.7
  Top Layer w0.3: C16.2 118.198,96.325 R29.2
NetC17_2: C17.2 U3.7 | length 2.5
  Top Layer w0.3: C17.2 113.336,92.19 U3.7
NetC20_2: C20.2 R34.2 U5.5
NetC21_2: C21.2 C22.2 FB1.1 R36.2 U7.6 | length 2.2
  Top Layer w0.3: U7.6 74.295,89.8 74.858,89.8 R36.2
NetC23_2: C23.2 C26.2 L1.1 SW3.3 U7.2 U7.3 | length 13.2
  Top Layer w1.2: SW3.3 65.977,80.577 67.085,80.577 68.344,81.836 68.344,82.346 68.35,82.352 68.35,83.457 67.805,84.001 67.805,89.352 68.624,90.171 68.906,90.171 69.275,90.54 L1.1
NetC24_2: C24.2 FB1.2 U6.2
NetJ1_5: J1.5 SPK1.+ | length 14.7
  Top Layer w0.5: v1(120.776,87.325) 121.726,86.375 125.85,86.375 SPK1.+
  Bottom Layer w0.5: J1.5 v1(120.776,87.325)
NetL1_2: L1.2 U7.5 | length 2.7
  Top Layer w0.5: L1.2 73.18,91 73.335,90.845 U7.5 U7.5@73.335,90.1
NetLED1_1: LED1.1 R32.2 | length 9.2
  Top Layer w0.15: LED1.1 66.725,72.15 68.275,73.7 v2(68.275,74.577) ; v2(69.725,76.027) 69.752,76.027 72.573,78.848 R32.2
  Bottom Layer w0.15: v2(68.275,74.577) v2(69.725,76.027)
NetM1_4: M1.4 U5.3 | length 4.8
  Top Layer w0.6: U5.3 77.635,75.325 78.11,75.8 79.64,75.8 80.3,75.14 M1.4
NetM1_6: M1.6 U5.1 | length 2.8
  Top Layer w0.6: U5.1 77.075,73.425 78.05,74.4 78.4,74.4 M1.6
NetR2_4: R2.4 U3.3 | length 20.8
  Top Layer w0.15: U3.3 120.446,93.543 121.543,93.543 122.375,94.375 125.1,94.375 125.881,93.594 125.881,93.094 128.425,90.55 128.425,90.493 128.718,90.2 128.775,90.2 130.675,88.3 134.7,88.3 135.321,87.679 135.321,87.429 v2(136,86.75)
  Bottom Layer w0.15: R2.4 R2.4 v2(136,86.75)
NetR2_5: R2.5 R28.1 | length 12.3
  Top Layer w0.15: R28.1 125.25,90.275 128.949,86.576 131.384,86.576 131.458,86.65 v2(133.975,86.65)
  Bottom Layer w0.15: v2(133.975,86.65) 133.975,85.576 R2.5
NetR4_1: R4.1 R6.2 U2.7 | length 4.6
  Top Layer w0.15: U2.7 94.19,83.113 R4.1 94.654,83.578 94.849,83.578 96.023,84.752 R6.2
NetR5_1: R5.1 U2.3 | length 2.4
  Top Layer w0.15: U2.3 95.46,74.088 R5.1
NetR7_3: R7.3 R8.1 | length 30.1
  Top Layer w0.15: R7.3 120.675,84.225 129.471,75.429 133.651,75.429 141.672,67.407 141.672,67.224 141.896,67 R8.1
NetR30_2: R30.2 USBC1.A5 | length 1.8
  Bottom Layer w0.1: USBC1.A5 70.623,88.825 71.275,88.825 71.469,89.019 71.669,89.019 72.048,89.398 R30.2
NetR31_2: R31.2 U4.5 | length 2.2
  Top Layer w0.3: R31.2 71.505,80.452 71.904,80.85 U4.5
NetR32_1: R32.1 U4.1 | length 2.1
  Top Layer w0.3: R32.1 74.127,78.902 74.516,79.291 U4.1
NetR33_2: R33.2 USBC1.B5 | length 1.6
  Bottom Layer w0.15: USBC1.B5 R33.2
NetR35_2: R35.2 U5.2 | length 4
  Top Layer w0.3: U5.2 76,74.375 75.45,74.925 75.45,75.553 76.469,76.572 77.023,76.572 R35.2
NetR36_1: R36.1 R37.2 U7.1 | length 4.3
  Top Layer w0.3: U7.1 75.075,91.74 75.558,92.223 R37.2 75.838,91.971 75.838,91.801 77.112,90.527 R36.1
NetSW1_2: SW1.2 U1.5 | length 19.8
  Top Layer w0.15: U1.5 112.249,78.264 114.942,80.956 121.931,80.956 122.95,79.938 122.95,78.758 122.25,78.058 122.25,76.425 SW1.2
R_LADDER: C7.1 R1.1 R7.2 U1.2 U1.6 | length 32.4
  Top Layer w0.15: U1.2 107.165,74.036 107.165,79.216 107.472,79.523 107.858,79.523 108.131,79.25 108.131,79.068 U1.6 108.935,77.47 111.676,74.729 111.869,74.729 112.25,74.348 C7.1 ; R1.1 108.452,79.54 108.935,79.057 108.935,78.828 109.135,79.028 109.328,79.028 115.525,85.225 R7.2
STYLUS: C13.1 pad.STYLUS U1.3 | length 29.7
  Top Layer w0.15: v2(108.281,78.352) 108.281,74.984 108.935,74.33 U1.3 108.867,73.469 108.867,71.017 pad.STYLUS ; v2(109.3,79.725) 109.3,82.2 114.386,87.286 118.352,87.286 122.338,91.271 C13.1
  Bottom Layer w0.15: v2(108.281,78.352) 108.338,78.409 108.338,78.706 109.3,79.667 v2(109.3,79.725)
VIBRATO: R3.2 SW1.3 | length 26.9
  Top Layer w0.15: R3.2 102.252,73.348 102.606,72.994 103.056,72.994 108.073,67.977 115.291,67.977 118.389,71.075 118.389,74.563 SW1.3
pads on no net: R2.2 R2.3 R7.1 SW3.1 U1.7 U3.1 U3.8 U5.4 USBC1.A6 USBC1.A7 USBC1.A8 USBC1.B6 USBC1.B7 USBC1.B8

## Polygon pours and split planes (outlines as drawn)
5V_USB on Top Layer "5V_USB_L01_P001" (solid, pour order 1): 73,82.425 71.025,82.425 70.8,82.65 69.225,82.65 69.225,84.075 68.375,84.925 68.375,89.075 68.675,89.375 70.775,89.375 71,89.15 71,87.025 73,85.025
GND on Top Layer "GND_L01_P017" (solid, pour order 17): 72.96,89.975 73.11,89.825 73.11,86.55 71.135,86.55 71.135,89.075 72.685,89.825 72.685,89.975
GND on Top Layer "GND_TOP" (solid, remove dead copper, pour order 16): 61.025,104.25 62.1,103.175 151.075,103.175 151.075,44.925 149.675,43.525 148.675,44.525 60.625,44.525
GND on Top Layer "GND_L01_P018" (solid, pour order 18): 80.65,88.85 80.65,89.725 80.125,90.25 78.575,90.25 77.95,89.625 77.95,88.85
BATT+ on Top Layer "BATT+_L01_P010" (solid, pour order 10): 77.65,81.85 77.65,83.125 73.95,83.125 73.8,82.975 73.8,82.475 74.8,82.475 75.425,81.85
5V on Top Layer "5V_L01_P002" (solid, pour order 2): 80.75,88.525 81.925,88.525 82.425,88.025 82.425,86.275 82.4,86.25 81.475,86.25 81.475,87.35 81.075,87.75 80.775,87.75
BATT+ on Top Layer "BATT+" (solid, pour order 13): 71.2,75.725 71.2,71.825 71.225,71.825 71.975,71.075 71.975,68.85 68.725,68.85 68.725,74.725 65.95,77.5 64.9,77.5 64.75,77.65 64.75,79.55 67,79.55 67.025,79.575 68.625,77.975 68.625,76.175 69.075,75.725
NetC23_2 on Top Layer "NETC23_2_L01_P005" (solid, pour order 5): 68.05,93.8 68.05,89.9 70.55,89.9 70.55,92.125 70.7,92.275 72.36,92.275 72.36,91.64 72.6,91.4 73.497,91.4 73.497,92.125 75.151,93.517 75.137,94.417 74.128,94.393 73.497,93.8
NetC21_2 on Top Layer "NETC21_2_L01_P006" (solid, pour order 6): 73.675,90.6 73.675,89.925 73.425,89.675 73.425,86.075 73.475,86.125 76.475,86.125 76.475,88.25 74.125,90.6
NetC24_2 on Top Layer "NETC24_2_L01_P007" (solid, pour order 7): 76.875,87.575 80.025,87.575 80.025,85.1 80.025,85.075 76.875,85.075
NetBATT-1_1 on Top Layer "NETBATT-1_1_L01_P008" (solid, pour order 8): 71.675,72.85 71.7,72.875 72.6,72.875 73.475,73.75 74.8,73.75 75.6,72.95 75.625,72.975 78.7,72.975 78.7,71.75 77.8,71.75 75,68.95 73.3,68.95 72.35,69.9 72.35,71.35 72.2,71.35 71.675,71.875
NetC20_2 on Top Layer "NETC20_2_L01_P009" (solid, pour order 9): 71.75,75.725 72.575,75.725 72.575,75.65 73.55,74.675 74.6,74.675 74.6,74.075 73.45,74.075 72.55,73.175 71.675,73.175
5V on Top Layer "5V_L01_P012" (solid, pour order 12): 112.7,95.975 113.85,95.975 114.3,95.525 114.3,94.2 116.1,94.2 116.725,93.575 116.725,93.175 112.725,93.175 112.7,93.2
GND on Bottom Layer "GND_L02_P000" (solid, remove dead copper, pour order 0): 61.468,44.323 151.384,44.323 151.638,44.577 151.13,45.085 151.13,104.267 60.325,104.267 57.912,101.854

## Other copper
Top Layer:
  region net A3: 65.024,47.879 64.008,48.895 64.008,65.659 67.437,65.659 67.437,57.023 68.961,55.499 70.485,55.499 70.485,47.879
  region net A#3: 67.945,65.659 73.533,65.659 73.533,57.404 72.136,56.007 69.469,56.007 67.945,57.531
  region net B3: 77.47,47.879 70.993,47.879 70.993,55.499 72.517,55.499 74.041,57.023 74.041,65.659 77.47,65.659
  region net C4: 77.978,47.879 84.455,47.879 84.455,55.499 82.931,55.499 81.407,57.023 81.407,65.659 77.978,65.659
  region net C#4: 81.915,65.659 87.503,65.659 87.503,57.404 86.106,56.007 83.439,56.007 81.915,57.531
  region net D4: 91.44,55.499 89.789,55.499 88.265,57.023 88.265,65.659 88.011,65.659 88.011,57.023 86.487,55.499 84.963,55.499 84.963,47.879 91.44,47.879
  region net D#4: 88.773,65.659 94.361,65.659 94.361,57.404 92.964,56.007 90.297,56.007 88.773,57.531
  region net E4: 98.425,47.879 91.948,47.879 91.948,55.499 93.472,55.499 94.996,57.023 94.996,65.659 98.425,65.659
  region net F4: 98.933,47.879 105.41,47.879 105.41,55.499 103.886,55.499 102.362,57.023 102.362,65.659 98.933,65.659
  region net F#4: 102.87,65.659 108.458,65.659 108.458,57.404 107.061,56.007 104.394,56.007 102.87,57.531
  region net G4: 112.395,55.499 110.744,55.499 109.22,57.023 109.22,65.659 108.966,65.659 108.966,57.023 107.442,55.499 105.918,55.499 105.918,47.879 112.395,47.879
  region net G#4: 109.728,65.659 115.316,65.659 115.316,57.404 113.919,56.007 111.252,56.007 109.728,57.531
  region net A4: 119.38,55.499 117.602,55.499 116.078,57.023 116.078,65.659 115.824,65.659 115.824,57.023 114.427,55.499 112.903,55.499 112.903,47.879 119.38,47.879
  region net A#4: 116.713,65.659 122.301,65.659 122.301,57.404 120.904,56.007 118.237,56.007 116.713,57.531
  region net B4: 126.365,47.879 119.888,47.879 119.888,55.499 121.412,55.499 122.936,57.023 122.936,65.659 126.365,65.659
  region net C5: 126.873,47.879 133.35,47.879 133.35,55.499 131.826,55.499 130.302,57.023 130.302,65.659 126.873,65.659
  region net C#5: 130.81,65.659 136.398,65.659 136.398,57.404 135.001,56.007 132.334,56.007 130.81,57.531
  region net D5: 140.335,55.499 138.684,55.499 137.16,57.023 137.16,65.659 136.906,65.659 136.906,57.023 135.382,55.499 133.858,55.499 133.858,47.879 140.335,47.879
  region net D#5: 137.668,65.659 143.256,65.659 143.256,57.404 141.859,56.007 139.192,56.007 137.668,57.531
  region net E5: 146.304,47.879 147.32,48.895 147.32,65.659 143.891,65.659 143.891,57.023 142.367,55.499 140.843,55.499 140.843,47.879
Bottom Layer:
  region net GND: 69.873,87.075 69.873,86.775 69.873,86.475 71.173,86.475 71.173,86.775 71.173,87.075 69.873,87.075
  region net 5V_USB: 69.873,87.875 69.873,87.575 69.873,87.275 71.173,87.275 71.173,87.575 71.173,87.875 69.873,87.875

## Silkscreen, mask and mechanical layers (free items; w line width, h text height)
Top Overlay:
  text "AUDIO" at 119.175,98.65 h1.5
  text "VOL" at 129.875,98.625 h1.5
  text "Mini Stylophone" at 84.124,94.975 h1.5
  text "V2.0" at 92.026,91.95 h1.5
  text "J.D 2026" at 89.077,89.475 h1.5
  text "TUNE" at 119.175,87.625 h1.1
  text "USB-C" at 64.625,87.45 h1.1 r90
  text "ON" at 64.925,83.8 h1.1
  text "VIB" at 119.15,81 h1.5
  text "OCT" at 114.075,80.975 h1.5
  text "-" at 74.035,71.31 h0.8
  text "CHRG" at 63.55,70.675 h0.8
  text "BATT" at 75.885,69.985 h0.8
  text "+" at 68.46,69.877 h0.8
Bottom Overlay:
  lines w0.254: 76.875,57.25 76.875,97.25 106.875,97.25 106.875,57.25 76.875,57.25
  text "303040 LiPo Batt" at 80.629,77.229 h1.52
  text "+" at 69.979,71.8 h1.52
  text "-" at 73.704,71.767 h1.52
  text "STYLUS" at 107.704,68.329 h1
  text "BATT" at 69.679,66.904 h1.52
  text "STYLUS" at 101.354,51.654 h1.52